# Allegro board DESIGN PROJECT 2 LAB 1.brd
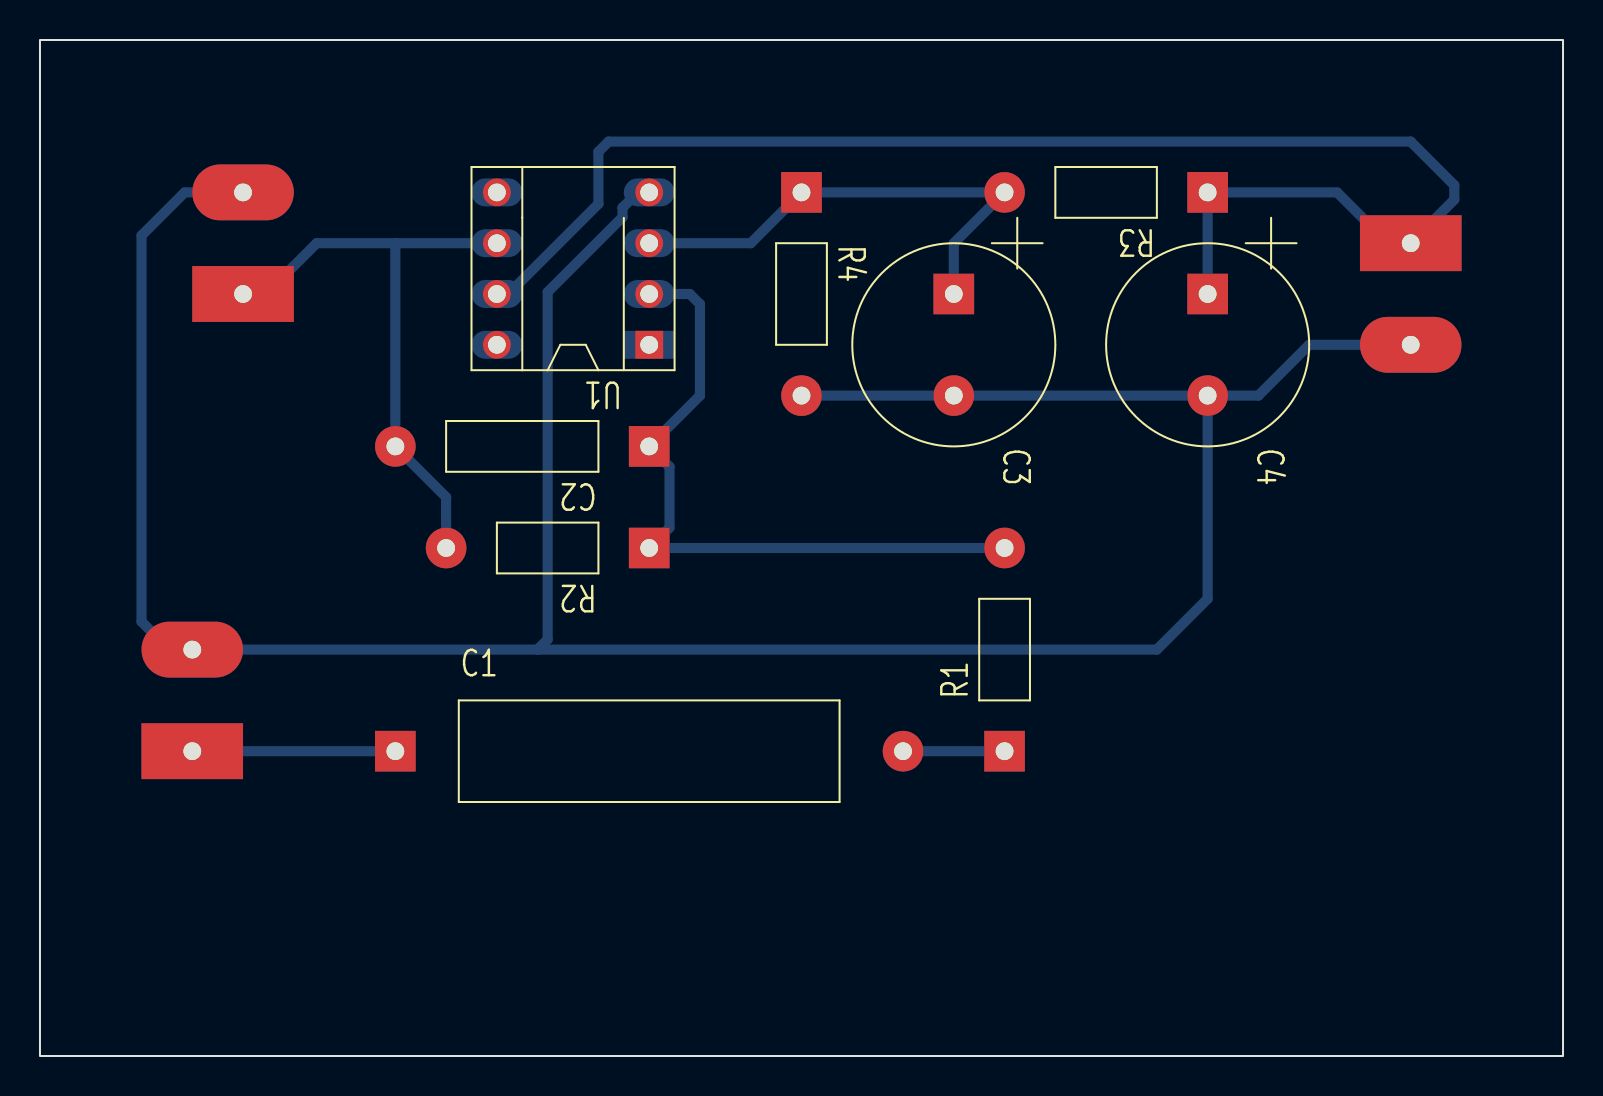
[diagram p0: board, top side]
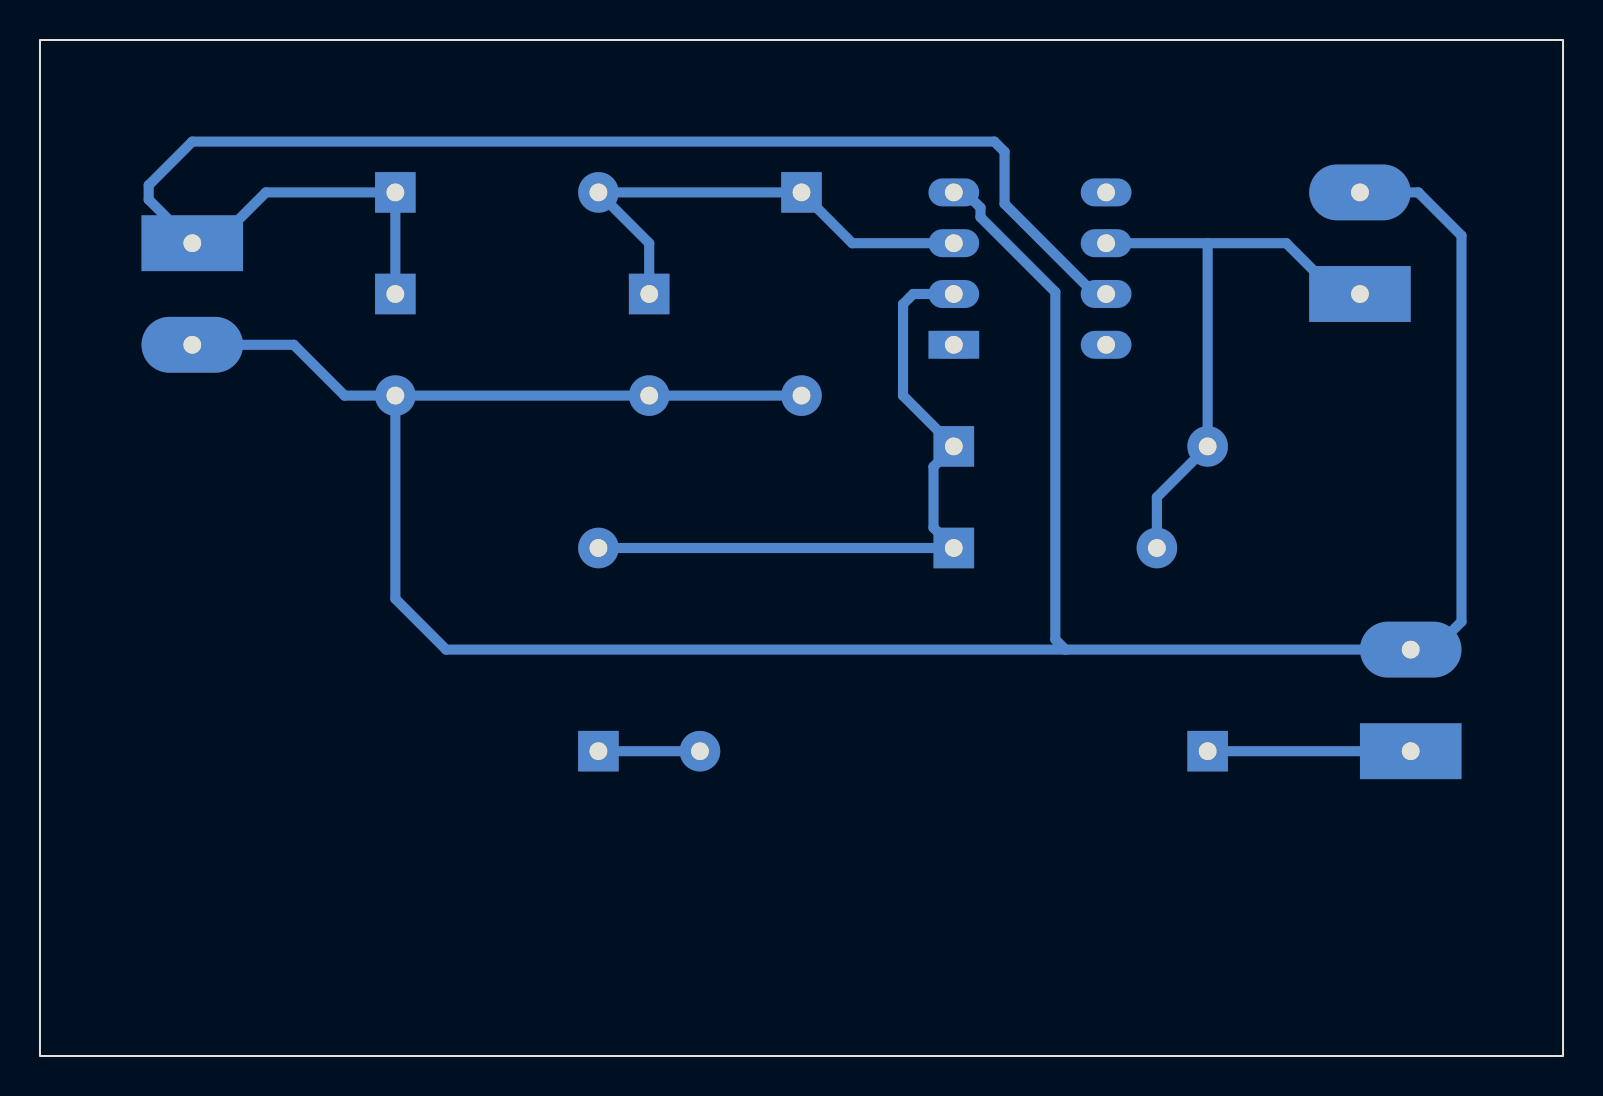
[diagram p1: board, bottom side, seen from below]

Outline 76.2 x 50.8 mm; copper layers: TOP, BOTTOM. Coordinates in mm from the lower left corner of the outline.
Outline path: rectangle 0,0 76.2,50.8

## Design rules (mm)
constraint set DEFAULT: min track width 0.508

## Placement (name value [footprint] x y rotation side)
C1  1u  [GU-RC1000]  17.78 15.24 0 top
C2  10n  [GU-RC500]  30.48 30.48 180 top
C3  4u7  [GU-CAPCYL200]  45.72 38.1 270 top
C4  4u7  [GU-CAPCYL200]  58.42 38.1 270 top
J1  CON2  [GU-TERMINAL2-200]  7.62 15.24 180 top
J2  CON2  [GU-TERMINAL2-200]  10.16 38.1 180 top
J3  CON2  [GU-TERMINAL2-200]  68.58 40.64 0 top
R1  330k  [GU-RC400]  48.26 15.24 90 top
R2  2000k  [GU-RC400]  30.48 25.4 180 top
R3  1k  [GU-RC400]  58.42 43.18 180 top
R4  1k  [GU-RC400]  38.1 43.18 270 top
U1  MCP6291  [GU-DIPSOCK8]  30.48 35.56 180 top

## Library data of the parts
C1 = CAP NP 1u
C2 = CAP NP 10n
C3 C4 = CAP POL 4u7
J1-J3 = CON2: User Part Number: TERMINAL2-200
R1 = Resistor 330k
R2 = Resistor 2000k
R3 R4 = Resistor 1k
U1 = MCP6291

## Footprints (pads in the part's own frame, mm; a bottom-side part is the same pattern mirrored in y, then rotated)
GU-CAPCYL200
  rect 2.032x2.032 hole 0.889: 1(0,0)
  round 2.032 hole 0.889: 2(5.08,0)
GU-DIPSOCK8
  rect 1.397x1.397 hole 0.889: 1(0,0)
  round 1.397 hole 0.889: 2(0,-2.54) 3(0,-5.08) 4(0,-7.62) 5(7.62,-7.62) 6(7.62,-5.08) 7(7.62,-2.54) 8(7.62,0)
GU-RC400
  rect 2.032x2.032 hole 0.889: 1(0,0)
  round 2.032 hole 0.889: 2(10.16,0)
GU-RC500
  rect 2.032x2.032 hole 0.889: 1(0,0)
  round 2.032 hole 0.889: 2(12.7,0)
GU-RC1000
  rect 2.032x2.032 hole 0.889: 1(0,0)
  round 2.032 hole 0.889: 2(25.4,0)
GU-TERMINAL2-200
  rect 5.08x2.794 hole 0.889: 1(0,0)
  oval 5.08x2.794 hole 0.889: 2(0,-5.08)

## Nets
GND: C3.2 C4.2 J1.2 J2.2 J3.2 R4.2 U1.4
VCC: C4.1 J3.1 R3.1 U1.7(VCC)
VREF: C3.1 R3.2 R4.1 U1.3
N00434: C1.1 J1.1
N00453: C2.1 R1.2 R2.1 U1.2
N00489: C2.2 J2.1 R2.2 U1.6
N000951: C1.2 R1.1

Pads without a net: U1 1 5 8

## Routing (per net, layer and track width the routed paths; a pad name or vN(x,y) marks a point on that pad's centre or on a via; arc(x,y) is an arc through that point)
GND: length 147.5
  BOTTOM w0.508: J2.2 7.24,43.18 5.08,41.02 5.08,21.72 6.48,20.32 J1.2 24.89,20.32 ; 24.89,20.32 55.88,20.32 58.42,22.86 C4.2 ; 24.89,20.32 25.4,20.83 25.4,38.2 29.14,41.94 29.14,42.42 29.91,43.18 U1.4 ; J3.2 63.5,35.56 60.96,33.02 C4.2 ; C4.2 C3.2 R4.2
VCC: length 73.6
  BOTTOM w0.508: C4.1 R3.1 64.9,43.18 67.44,40.64 J3.1 70.76,42.82 70.76,43.54 68.58,45.72 28.45,45.72 27.94,45.21 27.94,42.61 23.43,38.1 U1.7
VREF: length 25
  BOTTOM w0.508: U1.3 35.56,40.64 R4.1 R3.2 45.72,40.64 C3.1
N00434: length 10.2
  BOTTOM w0.508: J1.1 C1.1
N00453: length 34.6
  BOTTOM w0.508: U1.2 32.51,38.1 33.02,37.59 33.02,33.02 C2.1 31.5,29.46 31.5,26.42 R2.1 R1.2
N00489: length 30
  BOTTOM w0.508: R2.2 20.32,27.94 C2.2 17.78,40.64 ; 17.78,40.64 13.84,40.64 11.3,38.1 J2.1 ; 17.78,40.64 U1.6
N000951: length 5.1
  BOTTOM w0.508: C1.2 R1.1
